# Altium PCB A313_3.PcbDoc (part 3 of 3)
Units mm, origin at the board's own origin, x right, y up, seen from the top; angles counter-clockwise.
Board outline 230.01 x 157.01 mm, 2 copper layers (Top Layer, Bottom Layer); 198 components, 173 nets, 1021 pads, 579 vias.
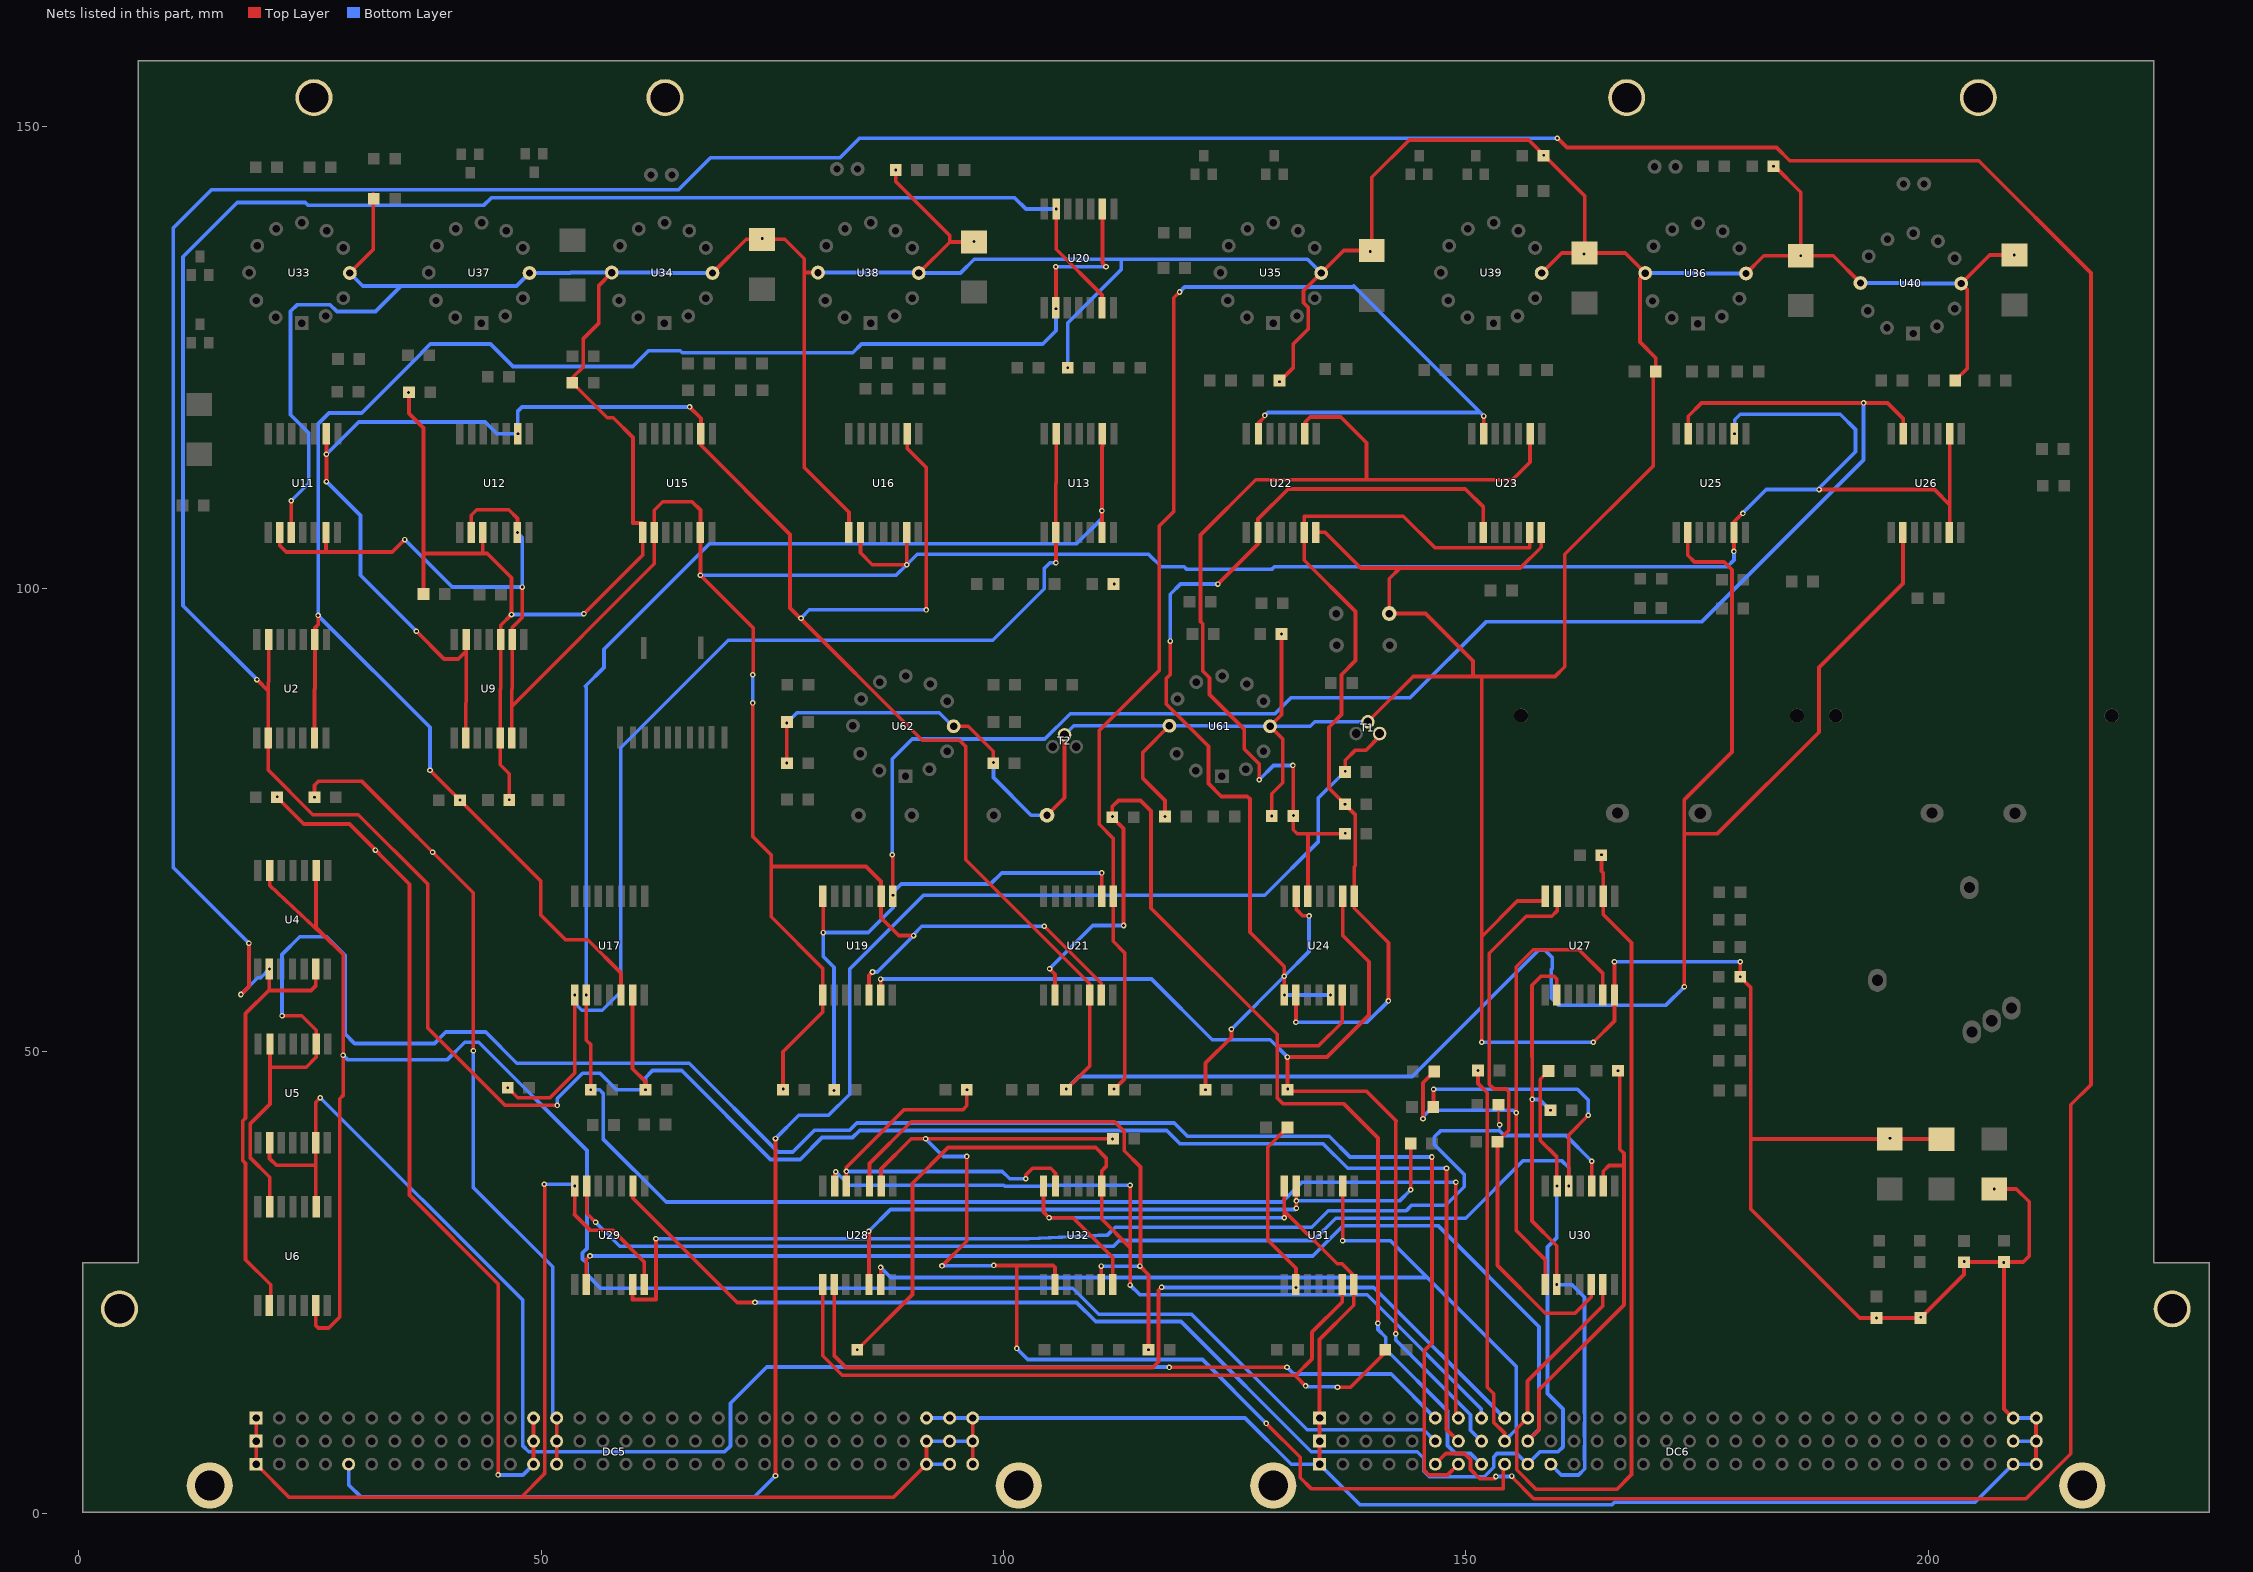
[diagram p3: the nets of this part, all layers, seen from the top]

## Via types
v1: diameter 0.6, hole 0.3, Top Layer to Bottom Layer, 579 vias

## Nets (pads, with @x,y where several pads share a name; then routed paths per layer and width w, separated by ;. In a path a pad name is that pad's centre, name@x,y a point inside that pad or via, vN(x,y) a via of type N, cw(c..) or ccw(c..) an arc to the next point about the centre after c; other vN are vias at no path point) (continued)
OT: C4.1 C5.1 C8.1 C9.2 C10.2 C11.2 C12.2 C13.2 C14.2 C18.2 C19.1 C20.2 C21.2 C22.2 C23.1 C24.1 C25.2 C26.2 C27.2 C28.1 C30.1 C32.1 C33.1 C35.1 C36.1 C38.1 C39.1 C41.1 D1.1 D7.1 DC5.A DC5.A1 DC5.A30 DC5.A31 DC5.A32 DC5.B DC5.B1 DC5.B30 DC5.B31 DC5.B32 DC5.C1 DC5.C30 DC5.C31 DC5.C32 DC6.A DC6.A1 DC6.A31 DC6.A32 DC6.B DC6.B1 DC6.B31 DC6.B32 DC6.C1 DC6.C31 DC6.C32 pad.ck R16.1 R17.1 R77.1 R78.1 R89.2 T1.2 T2.2 U9.5 U9.10 U11.3 U12.3 U15.1 U16.1 U22.7 U23.7 U27.7 U27.14 U29.7 U29.14 U31.7 U31.14 U32.7 U32.14 U33.4 U34.4 U34.10 U35.4 U36.4 U36.10 U37.4 U38.4 U38.10 U39.4 U40.4 U40.10 U61.4 U61.10 U62.4 | length 1268.8
  Top Layer w0.4: DC5.C1@19.175,10.325 DC5.A1@19.175,5.325 22.736,1.764 47.834,1.764 ; U11.3@22.975,106.1 v1(22.975,109.519) ; U33.4@29.307,134.154 31.85,136.697 C30.1@31.85,142.725 ; C36.1@35.7,121.25 35.7,118.975 37.28,117.395 37.28,103.75 ; C23.1@37.275,99.45 37.28,99.455 37.28,103.75 ; U12.3@43.682,106.1 43.682,103.911 43.6,103.829 ; C22.2@46.557,77.15 v1(46.557,77.2) 46.557,79.996 45.582,80.972 45.582,89.14 45.632,89.19 45.632,96.057 v1(46.792,97.217) 46.792,101.208 44.171,103.829 43.6,103.829 ; v1@50.378,35.6 50.378,4.424 50.361,4.407 50.361,4.292 47.834,1.764 ; C32.1@53.368,122.275 57.143,118.5 57.8,118.5 59.924,116.376 59.924,107.123 60.975,107.123 60.975,103.65 v1(54.625,97.3) ; C32.1@53.425,122.875 54.565,124.015 54.565,127.062 56.241,128.739 56.241,132.813 U34.10@57.632,134.204 ; v1(53.635,35.425) 53.635,32.364 53.6,32.33 55.286,30.644 57.706,30.644 61.135,27.215 U29.7@61.135,24.75 ; U34.4@68.529,134.154 72.175,137.8 76.346,137.8 78.45,135.696 78.45,134.225 ; v1(76.55,85.475) 76.55,85.575 R17.1@76.575,85.6 R16.1@76.575,81.15 ; U38.10@79.942,134.204 78.471,134.204 78.45,134.225 ; U16.1@83.285,106.1 83.285,108.292 78.45,113.126 78.45,134.225 ; C38.1@88.35,145.4 88.35,144.05 94.175,138.225 94.175,137.49 ; U38.4@90.839,134.154 94.175,137.49 ; DC5.B30@91.675,7.825 DC5.A30@91.675,5.325 88.114,1.764 47.834,1.764 ; U62.4@94.608,85.139 96.183,85.139 98.89,82.432 C8.1@98.89,81.225 ; DC5.A32@96.675,5.325 DC5.C32@96.675,10.325 ; C10.2@96.8,137.5 94.185,137.5 94.175,137.49 ; U32.14@104.325,35.425 104.325,32.598 v1(104.933,31.99) 107.51,31.99 111.825,27.675 U32.7@111.825,24.75 U32.7@111.613,24.75 ; D7.1@104.7,75.511 106.6,77.412 T2.2@106.6,84.2 ; R78.1@111.907,100.725 111.975,100.657 v1(111.975,100.519) ; v1(117.468,75.375) 117.468,77.107 115.075,79.5 115.075,82.33 U61.10@117.935,85.19 ; v1(129.018,75.425) 129.018,77.848 130.2,79.03 130.2,83.771 U61.4@128.832,85.139 130.075,86.383 v1(130.075,95.125) ; v1(129.85,122.4) 131.323,123.873 131.323,126.464 132.949,128.09 132.949,130.434 132.446,130.937 132.446,132.238 136.808,136.6 C11.2@139.825,136.6 139.825,144.505 143.87,148.55 156.807,148.55 162.85,142.507 C12.2@162.85,136.325 ; v1(130.375,31.99) 130.375,32.725 ; U31.14@130.375,35.425 130.375,32.725 ; U22.7@133.775,106.1 133.775,106.107 134.778,106.107 138.639,102.247 142.872,102.247 ; DC6.A1@134.175,5.325 134.175,18.815 137.875,22.515 137.875,25.742 136.621,26.996 136.104,26.996 130.375,32.725 ; T1.2@139.405,85.62 144.31,90.525 150.775,90.525 ; v1(151.72,50.964) 151.72,62.381 ; U23.7@158.15,106.1 158.15,104.507 155.889,102.247 142.872,102.247 ; U39.4@158.204,134.154 160.375,136.325 C12.2@162.85,136.325 ; U27.14@158.575,66.75 158.575,66.229 155.568,66.229 151.72,62.381 ; v1(163.785,50.964) 166.075,53.254 v1(166.075,59.676) ; v1(179.672,59.676) v1(179.672,58.05) 180.803,56.92 180.803,40.625 ; U36.4@180.304,134.1 182.229,136.025 v1(186.225,136.025) ; C35.1@183.275,145.85 186.225,142.9 v1(186.225,136.025) ; U40.10@192.68,133.076 189.731,136.025 v1(186.225,136.025) ; C21.2@201.425,40.475 201.4,40.5 180.928,40.5 180.803,40.625 ; C41.1@202.932,122.55 204.221,123.839 204.221,132.381 U40.4@203.576,133.026 206.651,136.1 v1(209.325,136.1) ; v1(207.15,35.1) 209.53,35.1 210.927,33.703 210.927,27.85 210.277,27.2 C26.2@208.2,27.2 ; DC6.C31@209.175,10.325 208.2,11.3 C26.2@208.2,27.2 ; DC6.A32@211.675,5.325 DC6.C32@211.675,10.325 ; 37.28,103.75 37.359,103.829 43.6,103.829 ; 142.872,102.247 141.725,101.1 D1.1@141.725,97.325 145.65,97.325 150.775,92.2 150.775,90.525 ; 150.775,90.525 151.625,90.525 ; 151.625,90.525 159.65,90.525 160.7,91.575 160.7,103.734 170.287,113.321 170.287,122.726 170.333,123.314 C20.2@170.55,123.5 170.55,124.971 168.839,126.682 168.839,133.582 U36.10@169.407,134.151 167.233,136.325 C12.2@162.85,136.325 ; 151.625,90.525 151.72,90.43 151.72,62.381 ; 180.803,40.625 180.803,32.947 192.6,21.15 C18.2@199.175,21.15 203.875,25.85 C28.1@203.875,27.165 203.91,27.2 C26.2@208.2,27.2
  Bottom Layer w0.4: v1(22.975,109.519) 24.872,111.416 24.872,116.852 22.891,118.833 22.891,130.009 23.591,130.709 27.189,130.709 27.915,129.983 32.086,129.983 34.854,132.752 ; U33.4@29.307,134.154 30.708,132.752 34.854,132.752 ; v1(46.792,97.217) 54.542,97.217 v1(54.625,97.3) ; v1(50.325,35.6) 53.575,35.6 53.635,35.54 v1(53.635,35.425) ; U34.4@68.529,134.154 63.099,134.154 63.048,134.204 53.193,134.204 53.142,134.154 U37.4@48.736,134.154 47.334,132.752 34.854,132.752 ; v1(76.55,85.475) 77.675,86.6 93.045,86.6 94.506,85.139 U62.4@94.608,85.139 ; U38.10@79.942,134.204 90.788,134.204 U38.4@90.839,134.154 95.356,134.154 96.85,135.648 112.724,135.648 ; DC5.A30@91.675,5.325 DC5.A31@94.175,5.325 ; DC5.B30@91.675,7.825 DC5.B32@96.675,7.825 ; DC5.C30@91.675,10.325 126.125,10.325 131.125,5.325 134.175,5.325 138.55,0.95 165.818,0.95 166.093,1.225 205.075,1.225 209.175,5.325 DC6.A32@211.675,5.325 ; v1(98.915,81.225) 98.915,79.585 102.989,75.511 D7.1@104.7,75.511 ; v1(104.933,31.99) v1(130.375,31.99) ; T2.2@106.6,84.2 107.59,85.19 123.348,85.19 123.399,85.139 133.178,85.139 133.658,85.62 T1.2@139.405,85.62 ; v1(106.95,123.9) 106.95,128.756 112.724,134.53 112.724,135.648 ; U35.4@134.361,134.154 132.867,135.648 112.724,135.648 ; v1(151.72,50.964) v1(163.785,50.964) ; v1(166.075,59.676) v1(179.672,59.676) ; U36.10@169.407,134.151 174.808,134.151 174.859,134.1 U36.4@180.304,134.1 ; U40.10@192.68,133.076 198.1,133.076 198.151,133.026 U40.4@203.576,133.026 ; DC6.B31@209.175,7.825 DC6.B32@211.675,7.825 ; DC6.C31@209.175,10.325 DC6.C32@211.675,10.325
  other v1: 194.425,21.15 199.2,21.225 208.175,27.15 203.9,27.24 195.875,40.575 76.55,81.175 35.638,121.227 162.775,136.2 139.675,136.475 96.825,137.575 73.9,137.875 88.35,145.3 183.275,145.7 158.425,146.9
oxa: DC5.A13 DC5.B13 DC5.C13 R75.1 | length 95.4
  Top Layer w0.4: R75.1@21.425,77.45 24.314,74.561 29.264,74.561 35.769,68.056 35.769,34.429 45.344,24.853 v1(45.344,4.171) ; DC5.A13@49.175,5.325 DC5.C13@49.175,10.325
  Bottom Layer w0.4: v1(45.344,4.171) 48.021,4.171 DC5.A13@49.175,5.325
  other v1: 32.075,71.75 21.45,77.525
oxb: DC5.A14 DC5.B14 DC5.C14 R76.1 | length 89.2
  Top Layer w0.4: v1(25.475,77.45) 25.475,78.75 25.9,79.175 30.621,79.175 42.667,67.129 v1(42.667,50.035) ; DC5.A14@51.675,5.325 DC5.C14@51.675,10.325
  Bottom Layer w0.4: v1(42.667,50.035) 42.667,35.262 51.25,26.679 51.25,10.75 DC5.C14@51.675,10.325
  other v1: 38.258,71.515
"upr 8r rm": DC6.C8 R63.1 U28.13 U32.9 | length 144.2
  Top Layer w0.4: U28.13@81.76,35.425 81.76,36.969 v1(81.87,36.969) ; v1(84.175,17.7) 90.15,23.675 90.15,35.724 94.011,39.585 109.965,39.585 111.1,38.45 111.1,37.513 110.625,37.038 110.625,31.838 113.696,28.767 ; v1(113.696,24.7) 113.696,28.767 ; v1(113.696,35.508) 113.696,28.767
  Bottom Layer w0.4: v1(81.87,36.969) 83.33,35.508 100.001,35.508 100.13,35.379 104.416,35.379 104.545,35.508 v1(113.696,35.508) ; v1(113.696,24.7) 114.75,23.646 139.335,23.646 151.675,11.306 DC6.C8@151.675,10.325
"upr 8r rm_": R54.2 U28.12 U32.13 | length 45.1
  Top Layer w0.4: U28.12@83.01,35.425 v1(83.01,36.994) 83.01,37.444 89.241,43.675 95.625,43.675 96.032,44.082 R54.2@96.032,46.125 ; v1(102.418,36.194) 102.418,36.593 103.15,37.325 105.1,37.325 105.625,36.8 U32.13@105.625,35.425
  Bottom Layer w0.4: v1(83.01,36.994) 99.866,36.994 100.666,36.194 v1(102.418,36.194)
  other v1: 96.05,45.825
"upr 9r rm": DC6.A9 R64.1 U28.9 U32.2 | length 132.6
  Top Layer w0.4: U28.9@86.76,35.425 86.76,37.26 90.025,40.525 v1(91.575,40.525) R64.1@111.843,40.525 ; v1(93.35,26.775) 96.015,29.44 v1(96.015,38.61) ; v1(98.95,26.825) 101.35,26.825 ; v1(101.425,17.85) 101.425,26.75 101.35,26.825 ; U32.2@105.575,24.75 105.575,26.637 105.387,26.825 101.35,26.825 ; v1(128.428,9.74) 132.085,6.082 132.085,3.872 133.271,2.687 154.063,2.687 154.063,5.213 DC6.A9@154.175,5.325
  Bottom Layer w0.4: v1(91.575,40.525) 93.49,38.61 v1(96.015,38.61) ; v1(93.35,26.775) 98.9,26.775 v1(98.95,26.825) ; v1(101.425,17.85) 102.627,16.648 116.831,16.648 116.833,16.65 118.433,16.65 118.433,16.648 121.52,16.648 v1(128.428,9.74)
  other v1: 111.781,40.502
"upr 9r rm_": R56.2 U28.10 U32.6 | length 63.3
  Top Layer w0.254: v1(110.575,26.75) v1@110.575,26.85
  Top Layer w0.4: U28.10@85.51,35.425 85.51,37.86 90.025,42.375 112,42.375 113.061,41.314 113.061,39.223 114.813,37.471 v1@114.813,26.75 ; U32.6@110.575,24.75 v1(110.575,26.75) ; v1(114.75,26.75) 115.675,25.825 v1(115.675,17.7)
  Bottom Layer w0.4: v1(110.575,26.75) v1(114.75,26.75)
"upr 10r rm": DC6.B9 R65.1 U28.6 U31.9 | length 141.6
  Top Layer w0.4: U28.6@86.71,24.75 v1(86.71,26.605) ; v1(136.675,29.501) U31.9@136.675,35.425 ; v1(151.325,47.9) 151.325,46.494 152.329,45.489 152.329,13.65 153.021,12.958 153.021,9.847 154.175,8.693 DC6.B9@154.175,7.825
  Bottom Layer w0.4: v1(86.71,26.605) 87.805,25.51 145.841,25.51 ; v1(136.675,29.501) 141.85,29.501 145.841,25.51 ; DC6.B9@154.175,7.825 155.45,9.1 155.45,15.901 145.841,25.51
"upr 10r rm_": R57.2 U28.5 U31.13 | length 73.3
  Top Layer w0.4: v1(85.426,30.517) 85.46,30.483 U28.5@85.46,24.75 ; v1(131.675,33.006) v1(131.675,33.806) U31.13@131.675,35.425 ; v1(144.043,35.007) R57.2@144.043,40
  Bottom Layer w0.4: v1(85.426,30.517) 87.792,32.883 131.552,32.883 v1(131.675,33.006) ; v1(131.675,33.806) 142.842,33.806 v1(144.043,35.007)
"upr 11r rm": DC6.C9 R66.1 U28.2 U31.2 | length 113.9
  Top Layer w0.4: U28.2@81.71,24.75 81.71,17.03 82.954,15.785 116.134,15.785 116.769,16.42 116.769,24.142 v1(117.099,24.472) ; R66.1@130.707,41.75 128.567,39.61 128.567,29.587 131.625,26.529 U31.2@131.625,24.75
  Bottom Layer w0.4: v1(117.099,24.472) 117.172,24.544 117.27,24.446 140.054,24.446 DC6.C9@154.175,10.325
  other v1: 131.625,24.446
"upr 11r rm_": R58.2 U28.1 U31.6 | length 83.7
  Top Layer w0.4: U28.1@80.46,24.75 80.46,17.055 82.572,14.943 131.599,14.943 ; v1(132.675,13.8) 131.599,14.876 131.599,14.943 ; v1(136.125,13.65) 137.525,13.65 141.275,17.4 R58.2@141.275,17.7 ; U31.6@136.625,24.75 136.625,22.865 133.375,19.615 133.375,16.719 131.599,14.943
  Bottom Layer w0.4: v1(132.675,13.8) 132.7,13.825 132.75,13.825 132.876,13.699 136.076,13.699 v1(136.125,13.65)
"upr 12r rm": DC6.A10 R67.1 U29.9 U30.13 | length 161
  Top Layer w0.4: U29.9@59.935,35.425 59.935,34.088 71.197,22.825 v1(73.125,22.825) ; R67.1@158.95,47.85 158.06,46.96 158.06,40.331 159.85,38.541 v1(159.85,35.425) U30.13@159.875,35.425
  Bottom Layer w0.4: v1(73.125,22.825) 107.902,22.825 109.974,20.753 119.197,20.753 133.284,6.666 144.76,6.666 145.453,5.973 145.453,4.597 146.075,3.975 151.998,3.975 153.021,4.998 153.021,6.121 153.379,6.479 155.521,6.479 156.675,5.325 158.021,6.671 159.971,6.671 160.5,7.2 160.5,11.308 158.832,12.976 158.832,28.832 159.85,29.85 v1(159.85,35.425)
"upr 12r rm_": R59.2 U29.13 U30.12 | length 146.1
  Top Layer w0.4: U29.13@54.935,35.425 54.935,32.458 v1(55.885,31.508) ; R59.2@146.482,43.95 146.513,43.98 v1(146.513,45.884) ; v1(161.125,35.425) 161.125,40.938 v1(163.243,43.057)
  Bottom Layer w0.4: v1(55.885,31.508) 58.502,28.891 111.892,28.891 112.527,29.526 133.539,29.526 135.946,31.933 149.986,31.933 156.215,38.162 160.356,38.162 161.125,37.393 v1(161.125,35.425) ; v1(146.513,45.884) 162.066,45.884 163.243,44.707 v1(163.243,43.057)
"upr 13r rm": DC6.B10 R68.1 U29.2 U30.9 | length 173.4
  Top Layer w0.4: U29.2@54.885,24.75 54.885,27.459 v1(55.28,27.854) ; DC6.B10@156.675,7.825 157.917,9.067 157.917,13.372 167.102,22.557 167.102,37.55 ; U30.9@164.875,35.425 164.875,37.018 165.482,37.625 167.027,37.625 167.102,37.55 ; v1(166.45,47.875) 166.65,47.675 166.65,39.4 167.102,38.948 167.102,37.55
  Bottom Layer w0.4: v1(55.28,27.854) 133.455,27.854 136.734,31.133 146.989,31.133 157.925,20.197 157.925,9.075 DC6.B10@156.675,7.825
"upr 13r rm_": R60.2 U29.6 U30.10 | length 131.2
  Top Layer w0.254: R60.2@153.532,44.2 153.532,42.168 v1(153.65,42.05)
  Top Layer w0.4: U29.6@59.885,24.75 59.885,23.151 62.413,23.151 v1(62.413,29.704) ; U30.10@163.625,35.425 v1(163.625,38.093)
  Bottom Layer w0.254: v1(153.65,42.05) 153.65,41.4 153.672,41.378
  Bottom Layer w0.4: v1(62.413,29.704) 102.7,29.704 111.257,30.111 112.096,30.949 133.349,30.949 135.134,32.733 142.786,32.733 143.574,32.773 144.133,33.332 147.829,33.332 149.84,35.343 149.84,36.664 146.589,39.915 146.589,40.703 147.264,41.378 153.672,41.378 154.162,40.888 160.83,40.888 v1(163.625,38.093)
"upr 14r rm": DC6.C10 R69.1 U27.9 U30.6 | length 106.2
  Top Layer w0.4: v1(164.675,71.25) 164.675,69.477 164.875,69.277 164.875,64.775 167.929,61.721 167.929,4.207 166.35,2.628 157.598,2.628 155.504,4.721 155.504,9.154 156.675,10.325 156.675,14.314 164.825,22.464 U30.6@164.825,24.75
"upr 14r rm_": R61.2 U27.13 U30.5 | length 61.1
  Top Layer w0.4: U27.13@159.875,66.75 159.875,65.163 159.301,64.588 156.548,64.588 152.543,60.584 152.543,46.407 153.049,45.901 154.37,45.901 154.653,45.617 154.653,41.428 R61.2@153.425,40.2 153.425,26.83 158.603,21.652 161.822,21.652 163.575,23.405 U30.5@163.575,24.75
"upr 15r rm": DC6.A11 R70.1 U27.2 U30.2 | length 67.5
  Top Layer w0.4: v1@157.156,44.775 157.156,31.634 159.825,28.965 v1(159.825,24.75) ; v1(157.175,44.775) 157.175,49.387 157.156,49.406 157.156,57.137 158.12,58.101 159.537,58.101 159.825,57.814 U27.2@159.825,56.075
  Bottom Layer w0.4: v1(157.175,44.775) 157.975,44.775 v1(159.15,43.6) ; DC6.A11@159.175,5.325 160.329,4.171 162.178,4.171 162.854,4.847 162.854,5.803 162.829,5.828 162.829,7.322 162.854,7.347 162.854,8.303 162.829,8.328 162.829,9.822 162.854,9.847 162.854,10.803 162.829,10.828 162.829,23.376 161.455,24.75 v1(159.825,24.75)
"upr 15r rm_": R62.2 U27.6 U30.1 | length 65.5
  Top Layer w0.4: v1(145.37,42.7) 145.37,46.595 R62.2@146.575,47.8 ; U30.1@158.575,24.75 158.575,27.469 155.453,30.591 v1(155.453,43.344) 155.453,59.133 157.296,60.975 162.246,60.975 164.825,58.396 U27.6@164.825,56.075
  Bottom Layer w0.4: v1(145.37,42.7) 145.37,42.912 146.061,43.604 155.193,43.604 v1(155.453,43.344)
upr_ap: R32.1 U9.6 U9.9 U11.2 U11.6 U12.2 U12.6 U15.2 U15.6 U16.2 U16.6 U19.1 U19.5 U19.9 U21.6 U25.6 U25.9 U26.6 U26.9 | length 411
  Top Layer w0.4: U11.2@21.725,106.1 21.725,104.675 22.425,103.975 33.9,103.975 v1(35.25,105.325) ; 26.725,104.15 U11.6@26.725,106.1 ; U12.2@42.432,106.1 42.432,107.957 43.025,108.55 46.5,108.55 47.432,107.618 v1(47.432,106.1) ; U9.6@46.832,83.85 46.832,87.311 ; v1(47.961,100.189) 47.961,96.887 46.882,95.808 46.882,89.19 46.832,89.14 46.832,87.311 ; v1(72.875,87.667) 72.875,73.225 74.875,71.225 74.875,69.95 ; v1(72.875,90.7) 72.93,90.755 72.93,95.755 v1(67.225,101.46) U15.6@67.225,106.1 67.226,106.101 67.226,108.519 66.323,109.423 63.152,109.423 62.225,108.495 62.225,102.704 46.832,87.311 ; R32.1@76.15,45.825 76.15,49.923 80.46,54.232 80.46,58.94 74.875,64.524 74.875,69.95 ; U16.2@84.535,106.1 84.535,103.89 85.81,102.615 v1(89.535,102.615) U16.6@89.535,106.1 ; U19.5@85.46,56.075 85.46,58.186 v1(85.832,58.559) ; v1(90.282,62.5) 88.682,62.5 86.76,64.422 86.76,68.338 85.122,69.975 74.9,69.975 74.875,69.95 ; v1(104.399,63.512) 110.575,57.336 U21.6@110.575,56.075 ; v1(179,104.05) U25.6@179,106.1 179,107.25 179.9,108.15 v1(179.975,108.15) ; v1(188.2,110.734) 200.689,110.734 202.322,109.1 ; U26.6@202.272,106.1 202.322,106.15 202.322,109.1 ; U26.9@202.322,116.775 202.322,109.1
  Bottom Layer w0.4: v1(35.25,105.325) 40.386,100.189 v1(47.961,100.189) 47.961,105.571 v1(47.432,106.1) ; v1@67.226,101.459 88.379,101.459 v1(89.535,102.615) 90.67,103.75 115.688,103.75 117.063,102.375 119.544,102.375 119.786,102.132 129.03,102.132 129.273,102.375 178.265,102.375 179,103.11 v1(179,104.05) ; v1(72.875,87.667) v1(72.875,90.7) ; v1(85.832,58.559) 86.34,58.559 v1(90.282,62.5) 90.282,62.627 91.166,63.512 v1(104.399,63.512) ; v1@179.096,116.775 179.096,118.296 179.675,118.875 190.5,118.875 192.15,117.225 192.15,114.818 188.2,110.868 v1(188.2,110.734) 182.483,110.734 179.975,108.225 v1(179.975,108.15)
  other v1: 76.175,45.9 179.05,116.775
upr_ap+nu: DC6.A8 R73.1 U21.2 U24.6 | length 132.6
  Top Layer w0.4: v1(104.984,58.914) 105.575,58.323 U21.2@105.575,56.075 ; v1(112.985,63.588) 112.985,74.09 R73.1@111.775,75.3 111.775,76.45 112.425,77.1 114.825,77.1 115.956,75.969 115.956,65.467 129.596,51.828 129.596,50.6 ; U24.6@136.625,56.075 136.625,53.125 134.1,50.6 129.596,50.6 ; v1(140.5,20.575) 140.5,40.506 140.544,40.55 136.769,44.325 130.2,44.325 129.596,44.929 129.596,50.6
  Bottom Layer w0.4: v1(104.984,58.914) 109.657,63.588 v1(112.985,63.588) ; v1(140.5,20.575) 140.5,19.893 141.331,19.062 141.331,17.766 148.011,11.086 148.011,7.357 148.889,6.479 150.521,6.479 DC6.A8@151.675,5.325
  other v1: 111.8,75.375
upr_ap_: R33.1 U9.2 U9.13 U11.9 U12.9 U15.9 U16.9 U21.5 U25.2 U26.2 | length 396.8
  Top Layer w0.4: v1(26.777,111.594) v1(26.777,114.566) ; v1(36.505,95.414) 39.502,92.417 41.044,92.417 41.882,93.255 ; U9.2@41.832,83.85 41.882,91.578 41.882,93.255 ; U9.13@41.882,94.525 41.882,93.255 ; v1(66.05,119.675) 67.275,118.45 67.275,115.516 76.917,105.874 76.917,97.927 91.215,83.628 95.23,83.628 95.916,82.943 95.916,70.693 109.325,57.284 109.325,48.382 R33.1@106.768,45.825 ; U16.9@89.585,116.775 89.585,115.175 91.649,113.111 v1(91.649,97.725) ; v1(173.64,56.958) 173.64,73.525 ; U25.2@174,106.1 174,103.627 174.723,102.904 177.946,102.904 178.796,102.054 178.796,82.358 173.64,77.202 173.64,73.525 ; U26.2@197.272,106.1 197.272,100.572 188.2,91.5 188.2,84.498 177.227,73.525 173.64,73.525 ; v1(26.777,114.566) U11.9@26.775,116.775 26.775,114.568 v1(26.777,114.566)
  Bottom Layer w0.4: v1(26.777,111.594) 30.45,107.921 30.45,101.469 v1(36.505,95.414) ; v1(26.777,114.566) 30.261,118.05 43.95,118.05 45.225,116.775 v1(47.482,116.775) 47.482,119.232 47.925,119.675 v1(66.05,119.675) ; v1(78.1,96.825) 79,97.725 v1(91.649,97.725) ; v1(106.793,45.9) 108.161,47.268 144.214,47.268 157.866,60.921 158.565,60.921 159.332,60.154 159.332,58.944 159.251,58.862 159.251,55.726 160,54.977 171.659,54.977 v1(173.64,56.958)
upr_c1: DC6.A6 U4.2 U4.6 U6.2 | length 557.1
  Top Layer w0.4: v1(17.525,56.125) 18.398,56.998 v1(18.398,61.67) ; U6.2@20.607,22.5 20.744,22.638 20.744,24.727 18.025,27.446 18.025,37.857 17.721,38.161 17.721,42.46 18.025,42.764 18.025,54.06 20.607,56.642 v1(20.607,58.875) ; 20.727,56.552 25.109,56.552 25.607,57.05 U4.6@25.607,58.875 ; DC6.A6@146.675,5.325 147.839,6.489 149.836,6.489 150.5,5.825 150.5,4.762 151.512,3.75 153.125,3.75 153.25,3.875 v1(153.25,4) ; v1(154.956,4.043) 154.956,3.963 157.333,1.586 210.571,1.586 215.435,6.45 215.435,44.202 217.612,46.379 217.612,134.163 205.475,146.3 185.025,146.3 183.6,147.725 160.95,147.725 159.925,148.75 159.9,148.775 v1(159.9,148.725)
  Bottom Layer w0.4: v1(17.525,56.125) 19.35,57.95 19.682,57.95 v1(20.607,58.875) ; v1(18.398,61.67) 10.219,69.849 10.219,139.033 14.337,143.15 64.861,143.15 68.327,146.616 82.321,146.616 84.43,148.725 v1(159.9,148.725) ; v1(153.25,4) 154.911,4 v1@154.945,4.035
upr_c2: DC6.B6 U4.9 U4.13 U6.6 | length 212.7
  Top Layer w0.4: U4.13@20.657,69.55 20.657,67.931 28.58,60.486 ; U6.6@25.607,22.5 25.607,20.357 25.914,20.05 27.025,20.05 28.225,21.25 28.225,44.843 28.58,45.198 v1(28.58,49.567) 28.58,60.486 ; U4.9@25.657,69.55 25.657,63.41 28.58,60.486
  Bottom Layer w0.4: v1(28.58,49.567) 29.063,49.084 39.859,49.084 41.725,50.95 43.25,50.95 54.95,39.25 54.95,28.656 54.48,28.186 54.48,27.523 54.95,27.053 54.95,25.839 56.419,24.37 107.489,24.37 110.306,21.553 120.344,21.553 132.847,9.05 145.45,9.05 DC6.B6@146.675,7.825
upr_c3: DC6.C6 U5.2 U5.6 U6.9 | length 173.5
  Top Layer w0.4: U5.2@20.625,40.1 20.625,38.4 21.375,37.65 25.6,37.65 25.625,37.625 ; U6.9@25.657,33.175 25.625,33.207 25.625,37.625 ; v1(26.117,44.97) 25.625,44.478 25.625,37.625 ; v1(117.925,15.8) 127.559,15.8 127.57,15.811 v1(130.662,15.811)
  Bottom Layer w0.4: v1(26.117,44.97) 48.021,23.065 48.021,7.304 48.659,6.666 69.83,6.666 70.467,7.304 70.467,11.927 74.389,15.848 117.877,15.848 v1(117.925,15.8) ; v1(130.662,15.811) 131.398,15.075 141.925,15.075 DC6.C6@146.675,10.325
upr_c4: DC6.A7 U5.9 U5.13 U6.13 | length 220.9
  Top Layer w0.4: U6.13@20.657,33.175 20.657,36.357 18.521,38.493 18.521,42.129 20.675,44.283 20.675,48.424 ; U5.13@20.675,50.775 20.675,48.424 ; v1(21.976,53.834) 24.11,53.834 25.675,52.269 25.675,49.361 24.581,48.267 20.832,48.267 20.675,48.424 ; v1(146.335,38.553) 146.335,18.427 145.521,17.613 145.521,4.654 146.004,4.171 148.021,4.171 DC6.A7@149.175,5.325
  Bottom Layer w0.4: v1(21.976,53.834) 21.976,60.464 23.881,62.369 26.777,62.369 28.784,60.362 28.784,51.878 29.825,50.837 38.461,50.837 39.693,52.069 43.998,52.069 47.37,48.697 66.002,48.697 75.608,39.091 77.208,39.091 79.569,41.452 83.344,41.452 84.117,42.225 118.464,42.225 119.898,40.791 135.243,40.791 137.481,38.553 v1(146.335,38.553)
upr_contr: DC6.B7 R72.1 U2.2 U2.13 U17.6 U20.6 U20.13 | length 379.1
  Top Layer w0.4: v1(19.259,90.182) 20.482,88.958 ; U2.13@20.532,94.525 20.532,89.947 20.482,89.897 20.482,88.958 ; v1@51.75,44.161 46.077,44.161 37.733,52.504 37.733,68.068 30.225,75.577 25.304,75.577 20.482,80.399 20.482,88.958 ; U17.6@59.885,56.075 59.885,48.1 61.275,46.71 v1(61.275,45.825) ; v1(105.7,141.075) 105.7,136.718 110.65,131.768 U20.6@110.65,130.4 ; v1(147.91,37.324) 147.91,9.09 DC6.B7@149.175,7.825
  Bottom Layer w0.4: v1(19.259,90.182) 11.258,98.183 11.258,135.902 17.131,141.775 24.488,141.775 24.763,141.5 43.829,141.5 44.629,142.3 101.201,142.3 102.426,141.075 v1(105.7,141.075) ; v1(51.75,44.125) 51.75,44.868 54.482,47.6 56.375,47.6 58.15,45.825 v1(61.275,45.825) 61.275,47.125 62.047,47.897 65.202,47.897 74.808,38.291 78.008,38.291 80.369,40.652 83.675,40.652 84.449,41.425 117.664,41.425 119.098,39.991 134.56,39.991 137.227,37.324 v1(147.91,37.324)
upr_contr_: R30.1 U2.6 U2.9 U17.5 U20.2 U20.9 | length 195.1
  Top Layer w0.4: U2.6@25.482,83.85 25.482,89.14 25.532,89.19 25.532,95.769 25.875,96.112 v1(25.875,97.125) ; v1(37.978,80.379) 49.95,68.407 49.95,64.725 52.625,62.05 55.025,62.05 58.635,58.44 U17.5@58.635,56.075 ; v1(105.65,134.843) 105.675,134.818 v1(105.675,130.3) ; U20.9@110.7,141.075 110.7,135.231 v1(111.088,134.843)
  Bottom Layer w0.4: v1(37.978,80.379) 37.978,85.022 v1(25.875,97.125) 25.875,117.829 27.06,119.015 30.59,119.015 37.084,125.509 37.084,125.564 37.995,126.475 44.524,126.475 46.945,124.054 59.906,124.054 61.601,125.75 65.043,125.75 65.268,125.525 83.686,125.525 84.636,126.475 104.244,126.475 105.675,127.906 v1(105.675,130.3) ; v1(105.65,134.843) v1(111.088,134.843)
  other v1: 41.232,77.175
upr_int: R39.1 U22.2 U23.2 U24.1 U24.5 U24.13 | length 126.4
  Top Layer w0.4: v1(118.039,94.347) 118.039,90.74 117.607,90.309 117.607,87.54 122.175,82.972 122.175,78.936 123.561,77.55 126.375,77.55 126.65,77.275 126.65,62.868 130.375,59.143 v1(130.375,58.101) U24.1@130.375,56.075 ; v1(121.85,45.825) 121.85,48.704 124.649,51.503 v1(124.649,52.375) ; v1(123.195,100.519) 127.525,104.849 127.525,107.541 130.79,110.806 149.946,110.806 151.9,108.852 U23.2@151.9,106.1 ; U24.13@131.675,66.75 131.675,65.315 132.361,64.629 ; v1@133.05,64.602 132.361,64.629 ; v1(133.051,64.629) 132.361,64.629
  Bottom Layer w0.4: v1(118.039,94.347) 118.039,99.409 119.15,100.519 v1(123.195,100.519) ; v1(124.649,52.375) v1(130.375,58.101) 133.051,60.777 v1(133.051,64.629) ; v1(130.4,56.075) v1(135.375,56.075)
upr_int+nu: DC6.B8 R74.2 U19.6 U24.9 | length 129.1
  Top Layer w0.4: U19.6@86.71,56.075 v1(86.71,57.797) ; U24.9@136.675,66.75 136.675,62.534 139.529,59.68 139.529,53.904 134.989,49.364 v1(130.707,49.364) R74.2@130.707,45.825 130.865,45.667 139.262,45.667 142.474,42.455 142.425,42.406 v1(142.425,19.425)
  Bottom Layer w0.4: v1(86.71,57.797) 116.003,57.797 122.575,51.225 128.846,51.225 v1(130.707,49.364) ; v1(142.425,19.425) 142.425,18.755 150.5,10.68 150.5,9 DC6.B8@151.675,7.825
  other v1: 130.732,45.9
upr_int+nu_: R38.1 U22.6 U23.6 U24.2 U24.8 | length 100
  Top Layer w0.4: v1(131.625,53.123) U24.2@131.625,56.075 ; v1(141.636,55.434) 141.636,61.731 137.925,65.442 137.925,69.938 138.029,70.042 138.029,75.596 135.2,78.425 135.2,85.041 136.556,86.397 136.556,90.715 138.079,92.238 138.079,97.548 132.525,103.102 132.525,107.86 143.236,107.86 146.64,104.456 156.9,104.456 U23.6@156.9,106.1
  Bottom Layer w0.4: v1(131.625,53.123) 139.324,53.123 v1(141.636,55.434)
  other v1: 136.925,76.7
upr_int_: C24.2 R42.1 U22.9 U23.9 U24.12 | length 108.2
  Top Layer w0.4: v1@127.65,79.325 v1(127.65,79.35) ; v1@127.666,79.35 127.666,81.059 126.025,82.7 126.025,84.837 122.281,88.581 122.281,90.385 121.544,91.121 121.544,96.227 121.316,96.455 121.316,105.828 127.285,111.797 139.25,111.797 ; v1(131.3,80.9) 131.325,80.875 C24.2@131.325,75.425 131.325,73.95 131.775,73.5 132.925,73.5 ; U22.9@132.575,116.775 132.575,117.975 133.175,118.575 136.476,118.575 139.25,115.801 139.25,111.797 ; U24.12@132.925,66.75 132.925,73.5 ; R42.1@136.925,73.5 132.925,73.5 ; U23.9@156.95,116.775 156.95,113.702 155.045,111.797 139.25,111.797
  Bottom Layer w0.4: v1(127.65,79.35) 129.2,80.9 v1(131.3,80.9)
  other v1: 136.95,73.575 131.35,75.5
upr_knac: DC6.C7 R71.1 U13.6 U13.9 U17.2 | length 248.1
  Top Layer w0.4: U17.2@54.768,56.075 v1(54.885,56.075) 54.885,51.175 55.375,50.685 R71.1@55.375,45.825 55.35,45.85 v1(55.35,45.825) ; U13.6@110.65,106.1 v1(110.65,108.444) 110.65,115.381 110.7,115.431 U13.9@110.7,116.775 ; v1(148.926,35.826) 148.926,10.574 DC6.C7@149.175,10.325
  Bottom Layer w0.4: v1(54.885,56.075) 54.885,89.344 54.768,89.46 56.805,91.498 56.805,93.464 68.23,104.888 107.93,104.888 110.65,107.608 v1(110.65,108.444) ; v1(55.35,45.825) 56.325,45.825 56.7,45.45 56.7,40.499 63.516,33.683 130.146,33.683 132.289,35.826 v1(148.926,35.826)
upr_knac_: R29.1 U13.2 U13.13 U17.1 | length 121.3
  Top Layer w0.4: v1(46.375,46.05) 47.464,44.961 50.967,44.961 53.635,47.629 v1(53.635,56.075) ; v1(105.675,102.825) 105.675,106.075 U13.2@105.65,106.1 105.65,111.391 105.7,111.441 U13.13@105.7,116.775
  Bottom Layer w0.4: v1(53.635,56.075) 53.635,55.19 54.398,54.427 56.602,54.427 58.603,56.428 58.603,82.816 70.236,94.449 98.837,94.449 104.399,100.011 104.399,102.199 105.025,102.825 v1(105.675,102.825)
upr_nu: R34.1 U19.8 U19.14 U21.9 U25.13 U26.13 | length 226.3
  Top Layer w0.4: U19.14@80.46,66.75 80.5,66.71 v1(80.5,62.825) ; R34.1@81.475,45.725 81.7,45.5 R34.1@81.7,45.825 ; v1(87.975,71.25) 88.01,71.215 U19.8@88.01,67.144 ; U19.8@88.01,66.75 U19.8@88.01,67.144 ; v1(88.05,66.864) 88.05,67.103 U19.8@88.01,67.144 ; U21.9@110.625,66.75 v1(110.625,69.277) ; U25.13@174.05,116.775 174.05,118.655 175.498,120.103 v1(193.02,120.103) 195.595,120.103 197.322,118.376 U26.13@197.322,116.775
  Bottom Layer w0.4: v1(81.675,45.75) 81.675,59.071 80.5,60.246 v1(80.5,62.825) 85.374,62.825 88.05,65.501 v1(88.05,66.864) 88.05,67.184 88.949,68.084 98.608,68.084 99.802,69.277 v1(110.625,69.277) ; v1(87.975,71.25) 87.975,81.606 90.125,83.755 104.472,83.755 107.215,86.499 129.368,86.499 131.094,88.225 143.972,88.225 152.172,96.425 175.5,96.425 193.02,113.945 v1(193.02,120.103)
upr_nu_: R37.1 U21.8 U22.13 U23.13 | length 158.1
  Top Layer w0.4: R37.1@111.925,45.825 113.1,47 113.1,60.653 111.875,61.878 111.875,73.003 110.35,74.528 110.35,84.677 116.845,91.172 116.845,106.793 118.42,108.368 118.42,131.47 v1(119.05,132.1) ; U22.13@127.575,116.775 127.575,117.929 128.25,118.604 v1(128.25,118.753) ; U23.13@151.95,116.775 v1(151.95,118.679)
  Bottom Layer w0.4: v1(119.05,132.1) 119.59,132.64 137.764,132.64 137.877,132.752 151.554,119.075 ; v1(128.25,118.753) 128.572,119.075 151.554,119.075 ; v1(151.95,118.679) 151.554,119.075
  other v1: 111.95,45.9
vih.compar_rc: DC5.A5 R9.1 T1.3 | length 181.4
  Top Layer w0.4: v1(75.342,4.076) v1(75.342,40.55) ; v1(136.95,80.275) 136.95,81.468 138.01,82.528 139.178,82.528 140.675,84.025 T1.3@140.675,84.35
  Bottom Layer w0.4: DC5.A5@29.175,5.325 29.175,3.114 30.518,1.771 73.037,1.771 v1(75.342,4.076) ; v1(75.342,40.55) 77.851,43.059 81.084,43.059 83.375,45.35 83.375,58.896 91.344,66.864 128.264,66.864 134.025,72.625 134.025,77.35 v1(136.95,80.275)
pads on no net: C15. C16. DC5.A6 DC5.A8 DC5.A10 DC5.A12 DC5.A17 DC5.A18 DC5.A19 DC5.A20 DC5.A23 DC5.A24 DC5.A27 DC5.A28 DC5.A29 DC5.B5 DC5.B6 DC5.B8 DC5.B10 DC5.B12 DC5.B17 DC5.B18 DC5.B19 DC5.B20 DC5.B23 DC5.B24 DC5.B27 DC5.B28 DC5.B29 DC5.C6 DC5.C8 DC5.C10 DC5.C12 DC5.C17 DC5.C18 DC5.C19 DC5.C20 DC5.C23 DC5.C24 DC5.C27 DC5.C28 DC5.C29 DC6.A5 DC6.A12 DC6.A13 DC6.A14 DC6.A15 DC6.A16 DC6.A17 DC6.A18 DC6.A19 DC6.A20 DC6.A21 DC6.A22 DC6.A23 DC6.A24 DC6.A25 DC6.A26 DC6.A27 DC6.A28 DC6.A29 DC6.A30 DC6.B5 DC6.B11 DC6.B12 DC6.B13 DC6.B14 DC6.B15 DC6.B16 DC6.B17 DC6.B18 DC6.B19 DC6.B20 DC6.B21 DC6.B22 DC6.B23 DC6.B24 DC6.B25 DC6.B26 DC6.B27 DC6.B28 DC6.B29 DC6.B30 DC6.C5 DC6.C11 DC6.C12 DC6.C13 DC6.C14 DC6.C15 DC6.C16 DC6.C17 DC6.C18 DC6.C19 DC6.C20 DC6.C21 DC6.C22 DC6.C23 DC6.C24 DC6.C25 DC6.C26 DC6.C27 DC6.C28 DC6.C29 DC6.C30 R45.4 R45.5 U2.4 U4.4 U5.4 U6.4 U9.4 U10.5 U10.6 U10.7 U10.8 U11.4 U11.12 U11.13 U11.14 U12.4 U12.12 U12.13 U12.14 U13.4 U15.4 U15.12 U15.13 U15.14 U16.4 U16.12 U16.13 U16.14 U17.4 U17.8 U17.9 U17.10 U17.12 U17.13 U17.14 U19.4 U20.4 U21.4 U21.12 U21.13 U21.14 U22.4 U23.4 U24.4 U25.4 U26.4 U27.4 U28.4 U29.4 U30.4 U31.4 U32.4 U33.2 U33.3 U33.6 U33.8 U33.11 U34.2 U34.3 U34.6 U34.8 U34.11 U35.2 U35.3 U35.6 U35.8 U35.11 U36.2 U36.3 U36.6 U36.8 U36.11 U37.2 U37.3 U37.6 U37.8 U37.11 U38.2 U38.3 U38.6 U38.8 U38.11 U39.2 U39.3 U39.6 U39.8 U39.11 U40.2 U40.3 U40.6 U40.8 U40.11 U61.2 U61.3 U61.6 U61.8 U61.11 U62.2 U62.3 U62.6 U62.8 U62.11

## Polygon pours and split planes (outlines as drawn)
OT on Top Layer "Top Layer-No Net" (solid, remove dead copper, pour order 4): 0.405,0.121 0.405,27.121 cw(c0.412,27.121) 0.412,27.128 6.405,27.128 6.405,157.121 cw(c6.412,157.121) 6.412,157.128 224.412,157.128 cw(c224.412,157.121) 224.419,157.121 224.419,27.128 230.412,27.128 cw(c230.412,27.121) 230.419,27.121 230.419,0.121 cw(c230.412,0.121) 230.412,0.114 0.412,0.114 cw(c0.412,0.121)
OT on Bottom Layer "Top Layer-No Net1" (solid, remove dead copper, pour order 5): 0.405,0.121 0.405,27.121 cw(c0.412,27.121) 0.412,27.128 6.405,27.128 6.405,157.121 cw(c6.412,157.121) 6.412,157.128 224.412,157.128 cw(c224.412,157.121) 224.419,157.121 224.419,27.128 230.412,27.128 cw(c230.412,27.121) 230.419,27.121 230.419,0.121 cw(c230.412,0.121) 230.412,0.114 0.412,0.114 cw(c0.412,0.121)

## Keep-outs
Keep-Out Layer:
  lines w0.2: 7.525,0.175 223.275,0.175
  lines w0.254: 7.525,13.725 7.525,133.4 7.525,150.7 223.275,150.7 223.275,0.175

## Other copper
Top Layer:
  rectangle net OT: 6.4,150.8 224.425,157.125
  rectangle net OT: 6.4,27.1 7.425,150.825
  rectangle net OT: 0.4,0.125 7.425,27.125
  rectangle net OT: 223.4,27.1 224.425,150.8
  rectangle net OT: 223.425,0.125 230.425,27.125
Bottom Layer:
  rectangle net OT: 6.4,150.8 224.425,157.125
  rectangle net OT: 6.4,27.075 7.425,150.85
  rectangle net OT: 0.4,0.05 7.475,27.125
  rectangle net OT: 223.4,27 224.425,150.825
  rectangle net OT: 223.4,0.125 230.425,27.125

## Silkscreen, mask and mechanical layers (free items; w line width, h text height)
Top Overlay:
  lines w0.2: 191.575,68.325 192,68.75 ; 192,66.825 192,68.75 ; 192.475,68.275 192,68.75 ; 31.45,71.15 31.45,72.35 32.7,72.35 32.7,71.15 31.45,71.15 ; 37.6,70.925 37.6,72.125 38.85,72.125 38.85,70.925 37.6,70.925 ; 67.15,14.25 68.4,14.25 68.4,15.45 67.15,15.45 67.15,14.25 ; 69.05,14.225 69.05,15.425 70.3,15.425 70.3,14.225 69.05,14.225 ; 70.7,14.225 70.7,15.425 71.95,15.425 71.95,14.225 70.7,14.225 ; 179,142 180.25,142 180.25,143.2 179,143.2 179,142 ; 201.75,140.475 203,140.475 203,141.675 201.75,141.675 201.75,140.475
  lines w0.254: 98.35,146.7 98.35,150.175 116.475,150.175 116.475,146.7 98.35,146.7
  text "A313-V.03" at 99.1,147.4 h2
  text "INT_A" at 181.025,142.25 h1
  text "INT_B" at 203.575,140.675 h1
  text "OC_A" at 30.775,73.125 h1
  text "OC_B" at 36.725,72.95 h1
  text "giam_tro" at 190.675,64.35 h1 r90
  text "Bxod_A" at 71.725,16.075 h1 r50
  text "Bxod_PK" at 69.725,16 h1 r50
  text "Bxod_B" at 67.525,15.925 h1 r50
Mechanical 1:
  drawing of 210 lines, arcs and shapes, not listed

## Text inside footprints (layer, text, board x,y; h text height)
C6: Mechanical 8 "1" at 13.022,119.886 h1 r270; Mechanical 8 "2" at 13.022,114.486 h1 r270
C7: Mechanical 8 "1" at 53.4,132.364 h1 r90; Mechanical 8 "2" at 53.4,137.764 h1 r90
C9: Mechanical 8 "1" at 73.875,132.464 h1 r90; Mechanical 8 "2" at 73.875,137.864 h1 r90
C10: Mechanical 8 "1" at 96.8,132.164 h1 r90; Mechanical 8 "2" at 96.8,137.564 h1 r90
C11: Mechanical 8 "1" at 139.825,131.264 h1 r90; Mechanical 8 "2" at 139.825,136.664 h1 r90
C12: Mechanical 8 "1" at 162.85,130.989 h1 r90; Mechanical 8 "2" at 162.85,136.389 h1 r90
C13: Mechanical 8 "1" at 186.225,130.689 h1 r90; Mechanical 8 "2" at 186.225,136.089 h1 r90
C14: Mechanical 8 "1" at 209.325,130.764 h1 r90; Mechanical 8 "2" at 209.325,136.164 h1 r90
C19: Mechanical 8 "1" at 207.15,35.164 h1 r90; Mechanical 8 "2" at 207.15,40.564 h1 r90
C21: Mechanical 8 "1" at 201.425,35.139 h1 r90; Mechanical 8 "2" at 201.425,40.539 h1 r90
C27: Mechanical 8 "1" at 195.85,35.164 h1 r90; Mechanical 8 "2" at 195.85,40.564 h1 r90
D1: Top Overlay "+" at 144.475,97.825 h1 r180
D2: Top Overlay "+" at 133.275,93.4 h1
D4: Top Overlay "+" at 81.575,75.012 h1
D7: Top Overlay "+" at 107.45,76.011 h1 r180
DC5: Top Overlay "32" at 95.842,12.65 h1; Top Overlay "C" at 7.975,9.777 h1; Top Overlay "B" at 7.975,7.277 h1; Top Overlay "A" at 7.975,4.777 h1; Top Overlay "1" at 19.008,12.65 h1; Bottom Overlay "32" at 97.5,12.675 h1; Bottom Overlay "1" at 19.575,12.45 h1 r1.82; Bottom Overlay "C" at 8.641,9.779 h1 r0.1; Bottom Overlay "B" at 8.641,7.278 h1 r0.05; Bottom Overlay "A" at 8.622,4.781 h1 r359.11
DC6: Top Overlay "32" at 210.867,12.65 h1; Top Overlay "C" at 123,9.777 h1; Top Overlay "B" at 123,7.277 h1; Top Overlay "A" at 123,4.777 h1; Top Overlay "1" at 134.033,12.65 h1; Bottom Overlay "32" at 212.525,12.675 h1; Bottom Overlay "1" at 134.6,12.45 h1 r1.82; Bottom Overlay "C" at 123.666,9.779 h1 r0.1; Bottom Overlay "B" at 123.666,7.278 h1 r0.05; Bottom Overlay "A" at 123.647,4.781 h1 r359.11
U33: Top Overlay "1" at 23.871,129.861 h1
U34: Top Overlay "1" at 63.093,129.861 h1
U35: Top Overlay "1" at 128.926,129.861 h1
U36: Top Overlay "1" at 174.868,129.807 h1
U37: Top Overlay "1" at 43.3,129.861 h1
U38: Top Overlay "1" at 85.403,129.861 h1
U39: Top Overlay "1" at 152.768,129.861 h1
U40: Top Overlay "1" at 198.141,128.733 h1
U61: Top Overlay "1" at 123.396,80.847 h1
U62: Top Overlay "1" at 89.172,80.847 h1